# Altium PCB Sw-Board-v1.0.PcbDoc
Units mm, origin at the board's own origin, x right, y up, seen from the top; angles counter-clockwise.
Board outline 16.25 x 20.09 mm, 2 copper layers (Top Layer, Bottom Layer), stack 1.57 mm thick; 4 components, 4 nets, 12 pads, 0 vias.
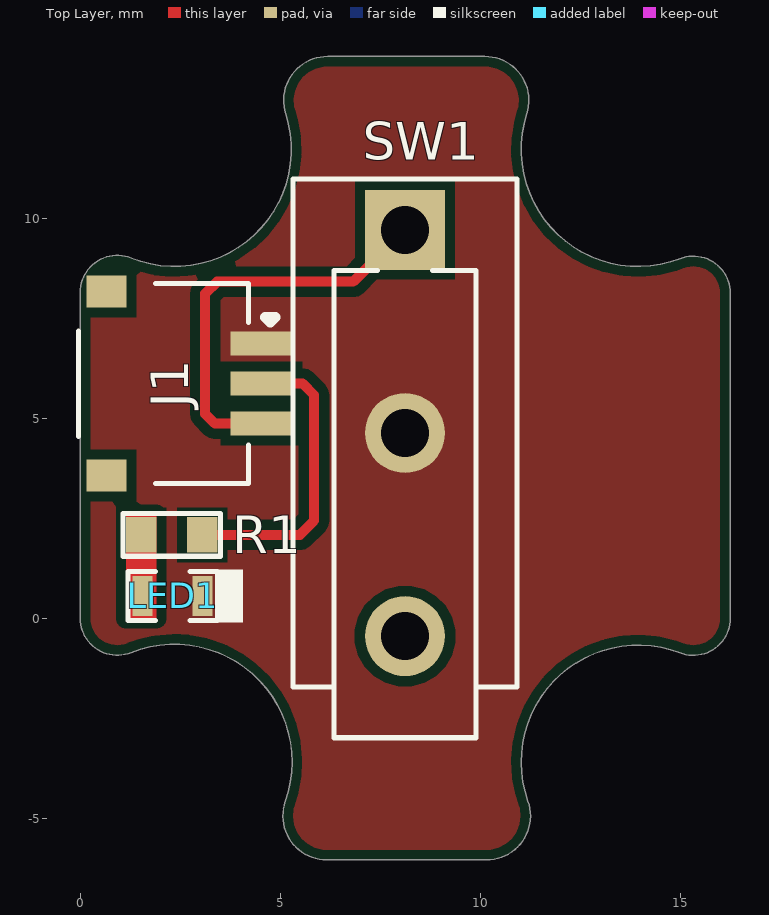
[diagram p0: Top Layer view]
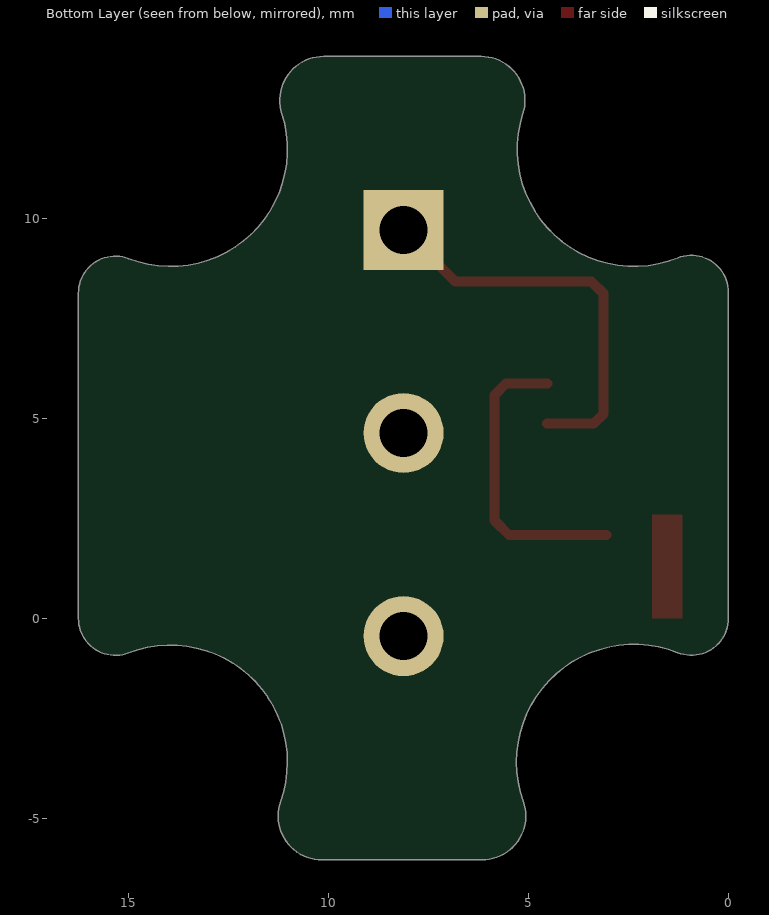
[diagram p1: Bottom Layer view, seen from below]
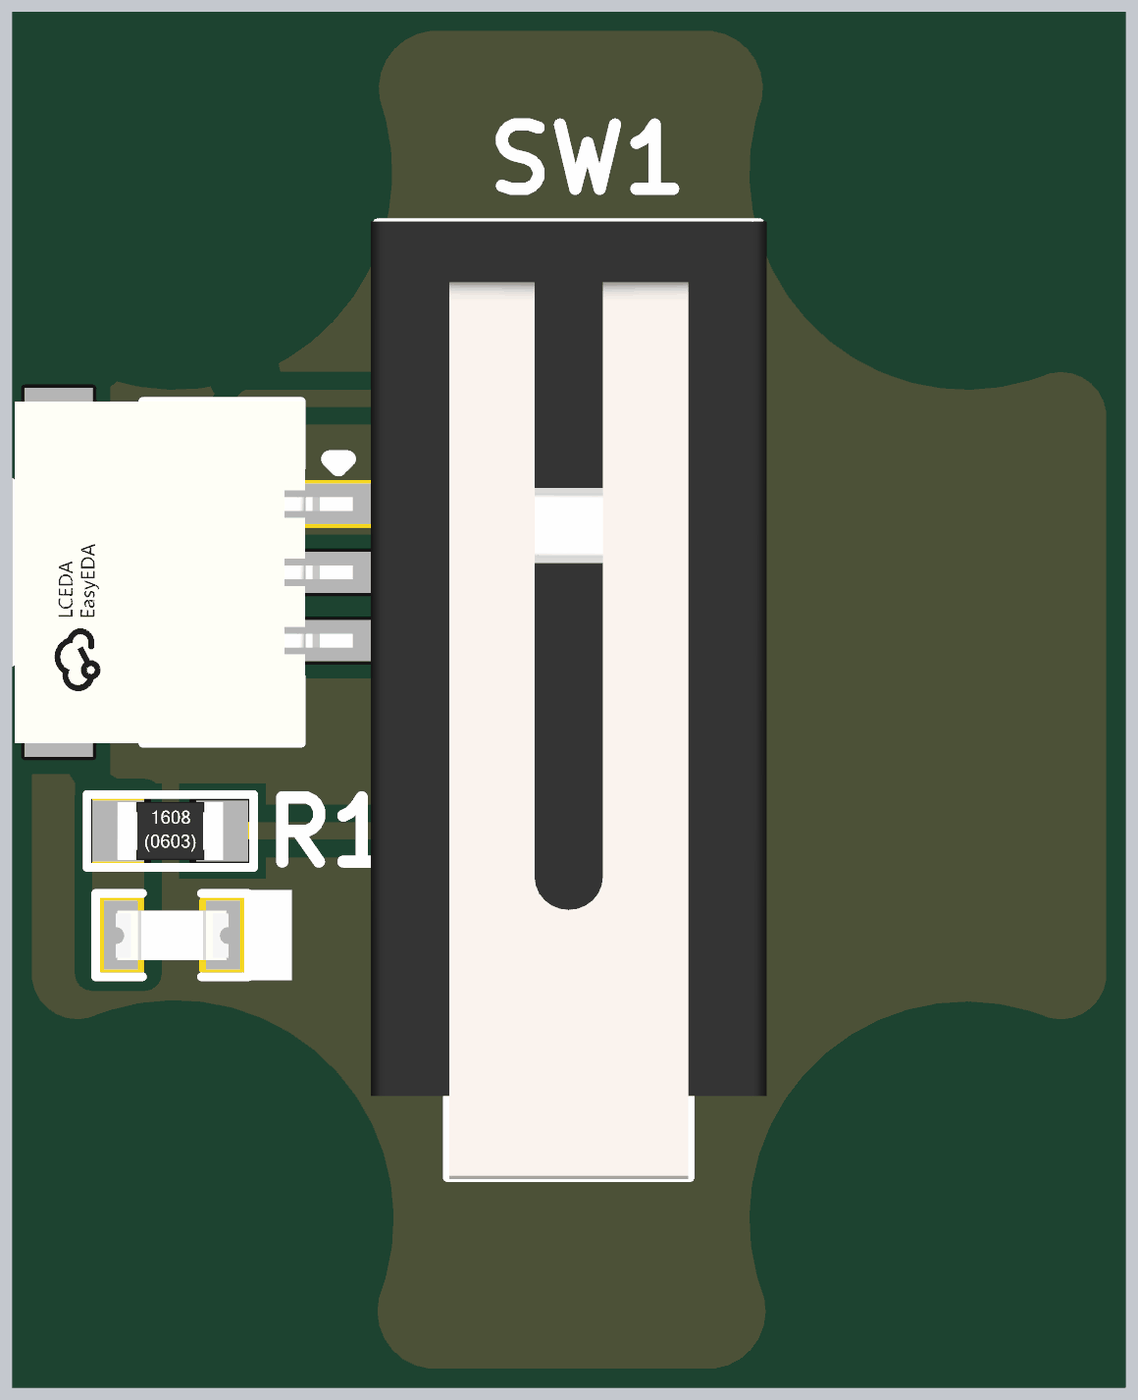
[diagram p2: 3D render of the assembled board from above, using the file's embedded part models]

## Layer stack, top to bottom
Top Solder: solder mask 0.01, Solder Resist, Dk 3.5
Top Layer: signal copper 0.035
Dielectric 1: dielectric 1.5, FR-4, Dk 4.8
Bottom Layer: signal copper 0.035
Bottom Solder: solder mask 0.01, Solder Resist, Dk 3.5

## Board outline
1.268,-0.86 cw(c2.357,-3.592) 5.129,-4.575 ccw(c6.166,-4.942) 6.166,-6.042 10.157,-6.042 ccw(c10.157,-4.942) 11.193,-4.573 cw(c13.945,-3.592) 14.993,-0.866 ccw(c15.325,-0.002) 16.25,-0.002 16.25,8.127 ccw(c15.325,8.127) 14.993,8.991 cw(c13.945,11.718) 11.164,12.611 ccw(c10.117,12.947) 10.117,14.047 6.185,14.047 ccw(c6.185,12.947) 5.138,12.611 cw(c2.357,11.718) 1.27,9.006 ccw(c0.926,8.147) 0,8.147 0,0 ccw(c0.926,0)

## Design rules (kind name [scope] priority, off if disabled: settings)
BoardOutlineClearance [All] p1: gap=0 ignorepadtopadclearanceinfootprint=FALSE except(0.254: Poly-OutlineEdge)
Clearance [All] p1: gap=0.254 ignorepadtopadclearanceinfootprint=FALSE except(0: Arc-Hole Track-Hole SMDPad-Hole THPad-Hole Via-Hole Fill-Hole Poly-Hole Region-Hole Text-Hole)
PolygonConnect [All] p1: connectstyle=Direct reliefconductorwidth=0.254 reliefentries=4 polygonreliefangle="90 Angle" airgapwidth=0.254
RoutingVias [All] p1: holewidth=0.711 width=1.27 viastyle="Through Hole" minholewidth=0.711 minwidth=1.27 maxholewidth=0.711 maxwidth=1.27
SilkToSilkClearance [All] p1: silktosilkclearance=0
SilkToSolderMaskClearance [IsPad] p1: minsilkscreentomaskgap=0 clearancetoexposedcopper=TRUE
SolderMaskExpansion [All] p1: expansion=0.102 istentingtop=FALSE
Width [All] p1: maxlimit=0.254 minlimit=0.254 preferedwidth=0.254
28 further rules are at their usual default settings.

## Components (designator, comment, footprint, x,y, rotation, side; value= is the part's Value field where it differs from the comment)
J1 "SM03B-SRSS-TB(LF)(SN)" SM03B-SRSS-TB(LF)(SN) 2.591,5.867 r270 top
LED1 "RED" LED-0603 2.311,0.559 r0 top
R1 "220R" Res-0603 2.286,2.083 r180 top
SW1 "DM1-135P" DM1-135P 8.12,4.632 r270 top locked

## Footprints (in the part's own frame and the unit in brackets; to place one, negate y for a bottom-side part, rotate by r counter-clockwise, add the part's x,y. Pads: shape width x height; smd on the part's side, far side on the other; paste and mask are expansions set on the pad)
DM1-135P [mm]
  rect 2x2 hole 1.2 paste+0 mask+0.051: 1(-5.08,0)
  round 2 hole 1.2 paste+0 mask+0.051: 2(5.08,0) 3(0,0)
  silkscreen extent -6.35,-2.8 7.62,2.8, body extent -6.37,-2.9 7.65,2.9, height 10.5
LED-0603 [mm]
  rect 0.5x1 smd: 1(-0.75,0) 2(0.75,0)
  silkscreen extent -1.12,-0.66 1.75,0.66, body extent -0.82,-0.37 0.82,0.36, height 0.68
Res-0603 [mil]
  rect 30x35 smd: 1(-30,0) 2(30,0)
  silkscreen extent -48,-21 48,21, body extent -31,-17 31,17, height 18
SM03B-SRSS-TB(LF)(SN) [mm]
  rect 0.6x1.55 smd paste+0 mask+0.051: 1(-1,1.938) 2(0,1.938) 3(1,1.938)
  rect 0.8x1 smd paste+0 mask+0.051: MP1(-2.3,-1.938) MP2(2.3,-1.938)
  silkscreen extent -2.5,-2.64 2.5,2.29, body extent -2.5,-2.58 2.5,2.37, height 2.91

## Part data
J1: "CONN HEADER SMD R/A 3POS 1MM", LCSC Part Number=C160403, Manufacturer=JST, ComponentLink1Description=https://datasheet.ciiva.com/26894/getdatasheetpartid-708885-26894671.pdf?src-supplier=Verical, ComponentLink1URL=https://datasheet.ciiva.com/26894/getdatasheetpartid-708885-26894671.pdf?src-supplier=Verical, ComponentLink2Description=https://datasheet.ciiva.com/8052/91630-8052263.pdf?src-supplier=Element14, ComponentLink2URL=https://datasheet.ciiva.com/8052/91630-8052263.pdf?src-supplier=Element14, ComponentLink3Description=https://datasheet.ciiva.com/16394/sm03b-srss-tblfsn-16394332.pdf?src-supplier=Future+Electronics, ComponentLink3URL=https://datasheet.ciiva.com/16394/sm03b-srss-tblfsn-16394332.pdf?src-supplier=Future+Electronics, Gender=29Gender, Item Type=Connectors, Lead Free=5697LeadFree, Manufacturer Part Number=SM03B-SRSS-TB(LF)(SN), Pricing="3000=0.22, 6000=0.215 (USD)", RoHS=Yes, Stock=6000, Supplier="Future Electronics"
LED1: library part NCD0603R3, "RED LED 0603 Light Emitting Diodes", LCSC Part Number=C3151730, Manufacturer="Foshan NationStar Optoelectronics", Package=0603, ComponentLink1Description=LCSC, ComponentLink1URL=https://www.lcsc.com/product-detail/Light-Emitting-Diodes-LED_Foshan-NationStar-Optoelectronics-NCD0603R3_C3151730.html, Item Type=LED, Manufacturer Part Number=NCD0603R3
R1: library part RC0603FR-07220RL, "RES SMD 220 OHM 1% 1/10W 0603", Case Code (Imperial)=0603, Case Code (Metric)=1608, LCSC Part Number=C107696, Manufacturer=Yageo, Max Operating Temperature=155°C, Max Power Dissipation=100mW, Min Operating Temperature=-55°C, Package Quantity=1, Supplier Part Number 1=311-220HRCT-ND, Temperature Coefficient=100ppm/°C, Tolerance=1%, Voltage Rating=50V, Case/Package=0603, ComponentLink1Description=http://www.yageo.com/documents/recent/PYu-RC_Group_51_RoHS_L_10.pdf?src-supplier=Digi-Key, ComponentLink1URL=http://www.yageo.com/documents/recent/PYu-RC_Group_51_RoHS_L_10.pdf?src-supplier=Digi-Key, ComponentLink2Description=http://www.farnell.com/datasheets/1868787.pdf?src-supplier=Element14, ComponentLink2URL=http://www.farnell.com/datasheets/1868787.pdf?src-supplier=Element14, Composition="Thick Film", Depth=0.8mm, Features="Moisture Resistant", Height=0.022inch, Item Type=Resistor, Lead Free="Lead Free", Length=1.6mm, Manufacturer Part Number=RC0603FR-07220RL, Military Standard=Not, Number of Pins=2, Number of Terminations=2, Packaging="Tape and Reel", Power Rating=100mW, Pricing 1="1=0.1, 10=0.023, 100=0.0094, 1000=0.00421, 2500=0.00366 (USD)", REACH SVHC="No SVHC", Resistance=220R, Stock 1=5843995, Supplier 1=Digi-Key, Termination=SMD/SMT, Voltage Rating (DC)=50V, Width=0.031inch
SW1: "1A 30V Single Pole Double Throw (SPDT) 1,000,000 Times Plugin Limit Switches ROHS", LCSC Part Number=C480264, Manufacturer="XKB Connectivity", Package=Plugin, ComponentLink1Description=LCSC, ComponentLink1URL=https://www.lcsc.com/product-detail/Limit-Switches_XKB-Connection-DM1-135P_C480264.html, Item Type=Switch, Manufacturer Part Number=DM1-135P

## Nets (pads, with @x,y where several pads share a name; then routed paths per layer and width w, separated by ;. In a path a pad name is that pad's centre, name@x,y a point inside that pad or via, vN(x,y) a via of type N, cw(c..) or ccw(c..) an arc to the next point about the centre after c; other vN are vias at no path point)
GND: J1.1 LED1.2 SW1.3
LIMIT_SW: J1.3 SW1.1 | length 10.2
  Top Layer w0.254: J1.3 3.366,4.867 3.12,5.113 3.12,8.112 3.423,8.415 6.823,8.415 SW1.1
LIMIT_SW_LED: J1.2 R1.1 | length 7.5
  Top Layer w0.254: R1.1 5.486,2.083 5.845,2.441 5.845,5.581 5.559,5.867 J1.2
NetLED1_1: LED1.1 R1.2
pads on no net: J1.MP1 J1.MP2 SW1.2

## Polygon pours and split planes (outlines as drawn)
GND on Top Layer "NONET_L01_P-001" (solid, remove dead copper, pour order 0): 1.268,-0.86 cw(c2.357,-3.592) 5.129,-4.575 ccw(c6.166,-4.942) 6.166,-6.042 10.157,-6.042 ccw(c10.157,-4.942) 11.193,-4.573 cw(c13.945,-3.592) 14.993,-0.866 ccw(c15.325,-0.002) 16.25,-0.002 16.25,8.127 ccw(c15.325,8.127) 14.993,8.991 cw(c13.945,11.718) 11.164,12.611 ccw(c10.117,12.947) 10.117,14.047 6.185,14.047 ccw(c6.185,12.947) 5.138,12.611 cw(c2.357,11.718) 1.27,9.006 ccw(c0.926,8.147) 0,8.147 0,0 ccw(c0.926,0)

## Other copper
Top Layer:
  rectangle net NetLED1_1: 1.143,0 1.905,2.591

## Silkscreen, mask and mechanical layers (free items; w line width, h text height)
BoardOut:
  the board outline again, w0.254

## Dimensions
10.117,14.047 to 10.157,-6.042 on Mechanical 1
0,8.147 to 16.25,8.127 on Mechanical 1